# Altium PCB OFP_MCM_v1.5.PcbDoc (part 8 of 8)
Units mm, origin at the board's own origin, x right, y up, seen from the top; angles counter-clockwise.
Board outline 110 x 120 mm, 4 copper layers (Top Layer, Layer 1, Layer 2, Bottom Layer), stack 1.576 mm thick; 353 components, 268 nets, 1240 pads, 519 vias.
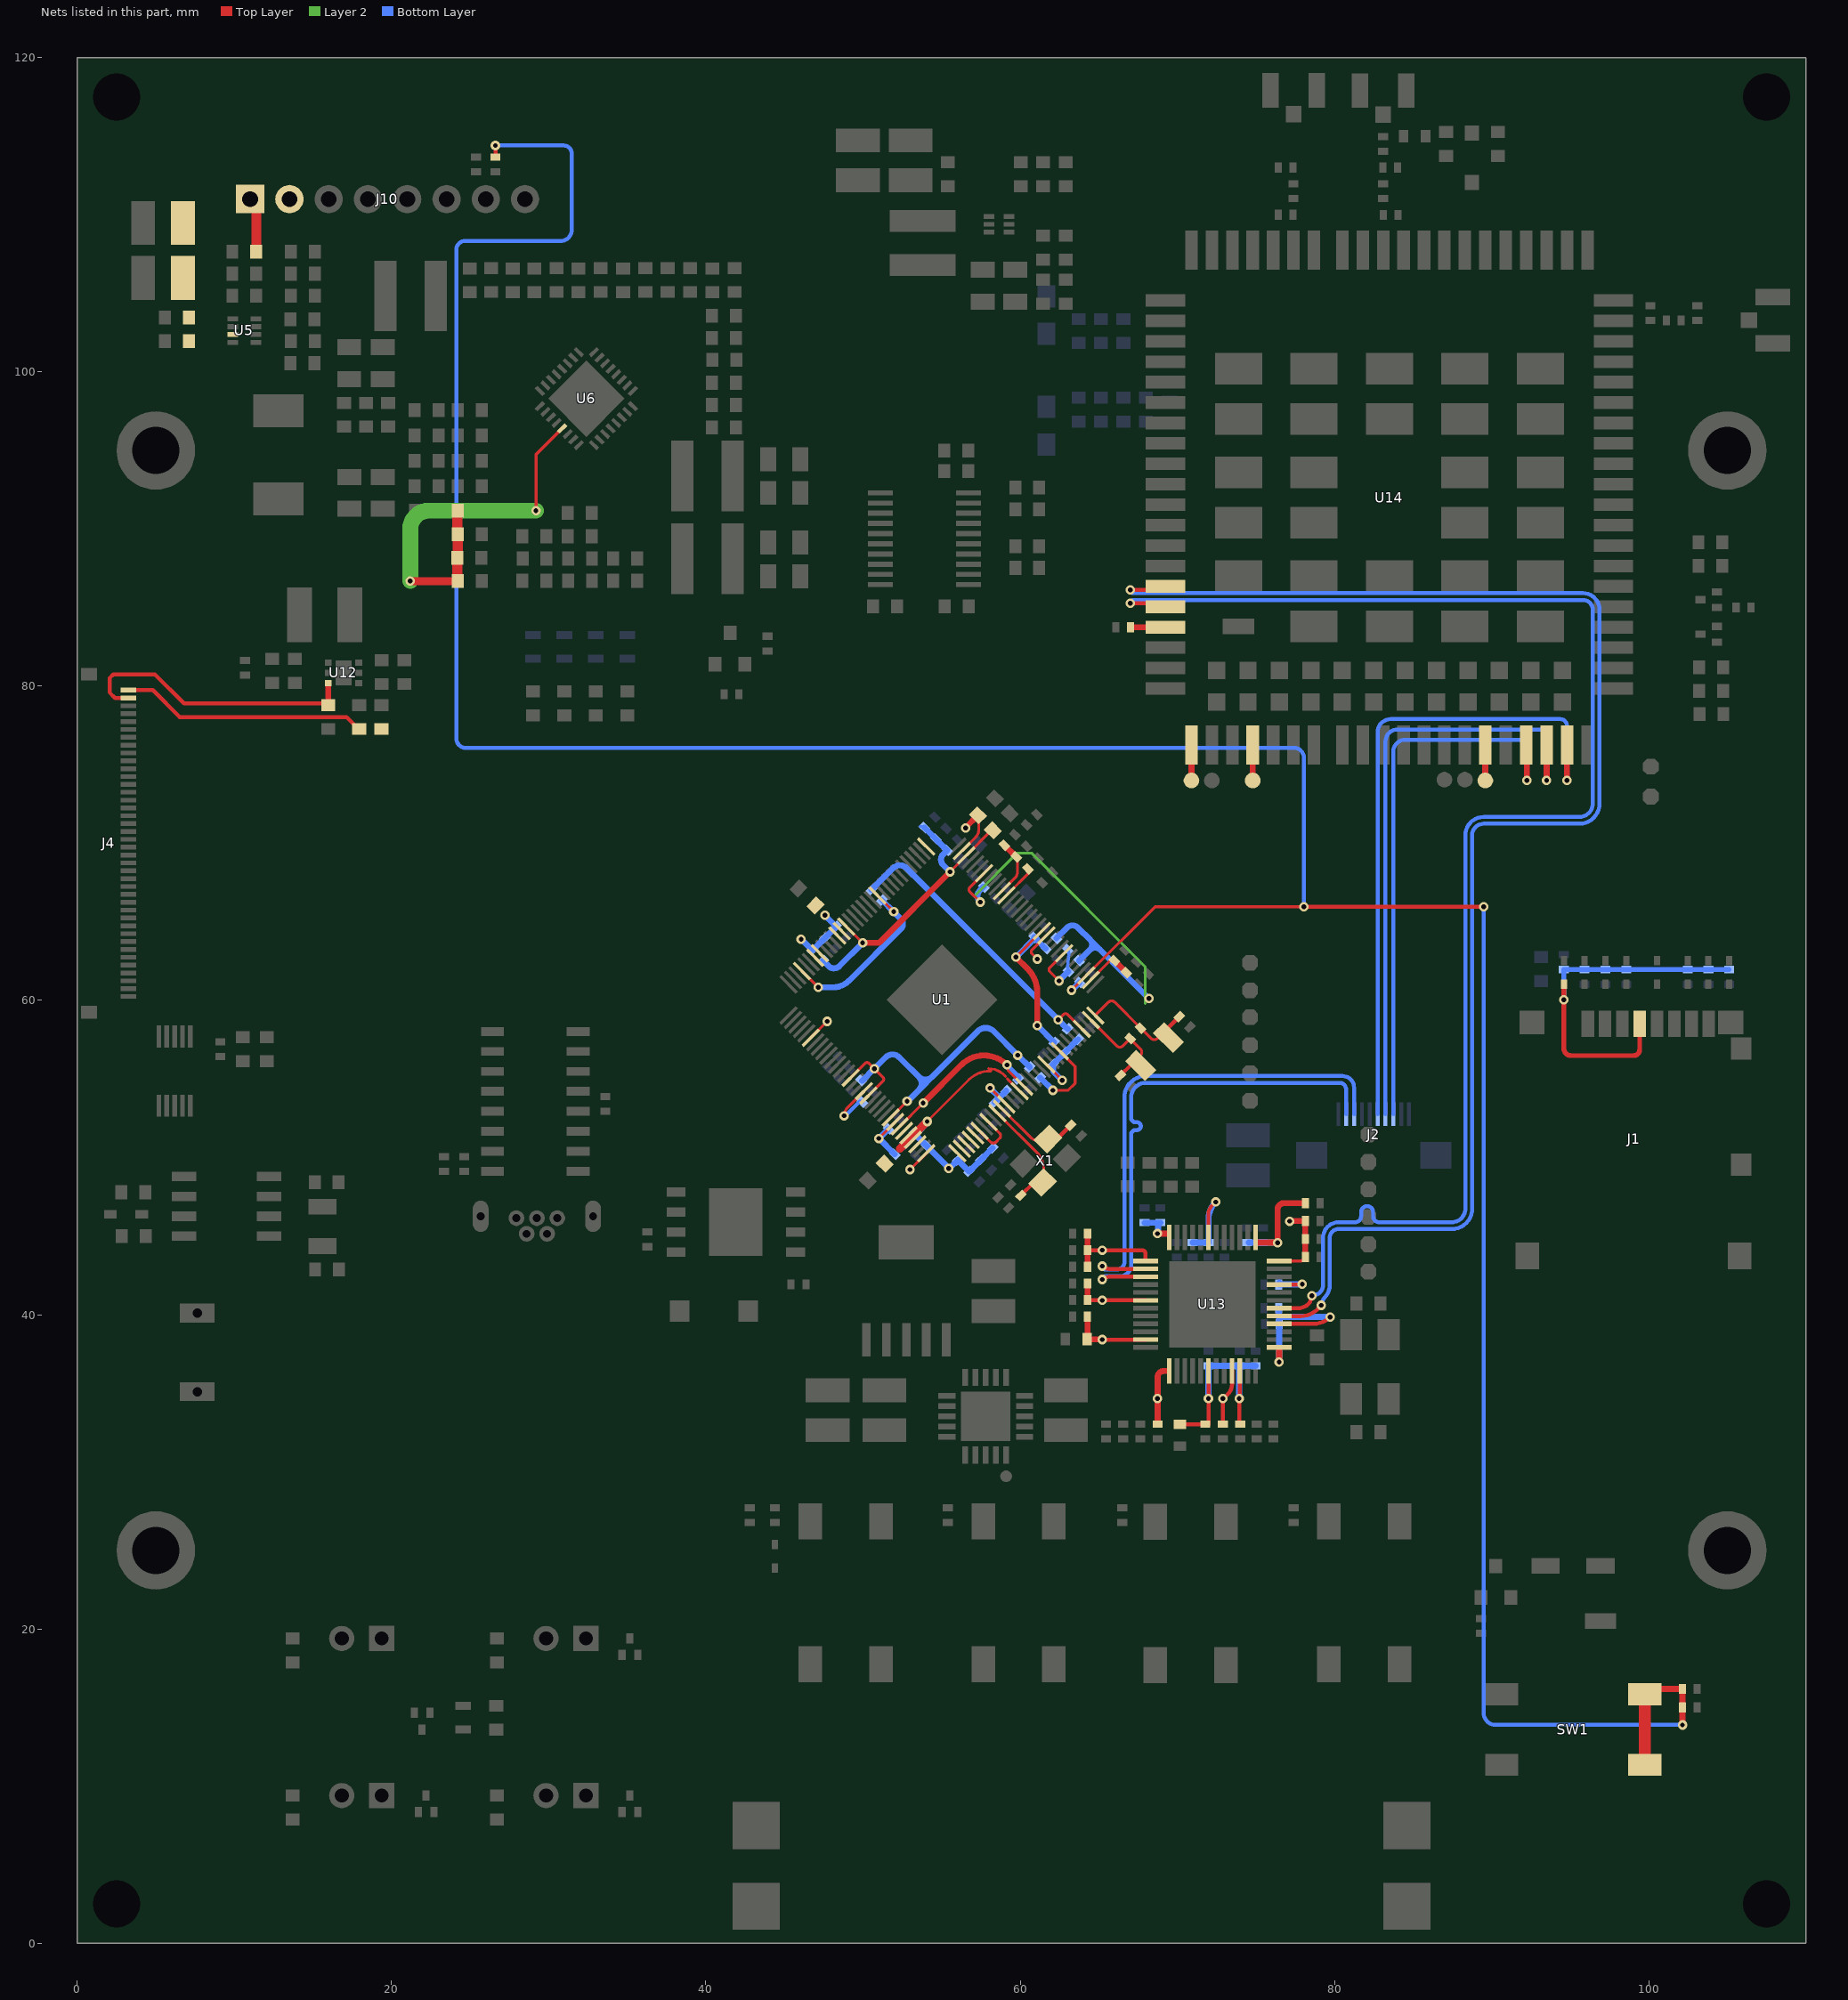
[diagram p6: the nets of this part, all layers, seen from the top]

## Via types
v1: diameter 0.6, hole 0.3, Top Layer to Bottom Layer, tented both sides, 475 vias
v2: diameter 0.5, hole 0.3, Top Layer to Bottom Layer, tented both sides, 44 vias

## Nets (pads, with @x,y where several pads share a name; then routed paths per layer and width w, separated by ;. In a path a pad name is that pad's centre, name@x,y a point inside that pad or via, vN(x,y) a via of type N, cw(c..) or ccw(c..) an arc to the next point about the centre after c; other vN are vias at no path point) (continued)
USB-GSM-D_N: U13.42 U14.70 | length 95.7
  Top Layer w0.254: v1(67.018,85.273) 69.027,85.273 cw(c69.027,85.05) U14.70@69.25,85.05 ; U13.42@76.482,40.417 77.688,40.417 ccw(c77.688,41.357) 78.353,40.692 ccw(c78.003,41.042) 78.498,41.042 cw(c78.724,41.042) v1(78.564,41.202)
  Bottom Layer w0.254: v1(67.018,85.273) cw(c67.229,85.273) 67.229,85.484 95.823,85.484 cw(c95.823,84.872) 96.434,84.872 96.434,72.467 cw(c96.18,72.468) 96.43,72.424 96.421,72.373 cw(c95.593,72.52) 95.74,71.692 95.689,71.683 cw(c95.645,71.933) 95.646,71.679 89.49,71.679 ccw(c89.49,70.519) 88.33,70.519 88.33,46.687 cw(c88.076,46.688) 88.326,46.644 88.317,46.592 cw(c87.476,46.74) 87.625,45.9 87.573,45.891 cw(c87.529,46.141) 87.53,45.887 83.868,45.887 82.84,45.887 cw(c82.84,46.268) 82.459,46.268 82.459,46.534 ccw(c82.078,46.534) 81.697,46.534 81.697,46.268 cw(c81.316,46.268) 81.316,45.887 81.189,45.887 80.271,45.887 ccw(c80.271,44.889) 79.272,44.889 79.272,42.778 ccw(c79.704,42.778) 79.273,42.747 cw(c79.02,42.729) 79.274,42.729 79.274,41.897 cw(c78.59,41.897) 79.074,41.413 cw(c78.724,41.763) 78.724,41.268 ccw(c78.724,41.042) v1(78.564,41.202)
USB-GSM-D_P: U13.41 U14.69 | length 95.8
  Top Layer w0.254: v1(67.018,86.127) 69.027,86.127 ccw(c69.027,86.35) U14.69@69.25,86.35 ; U13.41@76.482,39.917 77.888,39.917 ccw(c77.888,41.363) 78.91,40.34 v1(79.168,40.598)
  Bottom Layer w0.254: v1(67.018,86.127) ccw(c67.229,86.127) 67.229,85.916 95.823,85.916 cw(c95.823,84.872) 96.866,84.872 96.866,72.467 cw(c96.18,72.468) 96.856,72.348 96.846,72.297 cw(c95.593,72.52) 95.816,71.267 95.765,71.258 cw(c95.645,71.933) 95.647,71.247 89.49,71.247 ccw(c89.49,70.519) 88.761,70.519 88.761,46.686 cw(c88.076,46.688) 88.751,46.569 88.742,46.517 cw(c87.476,46.74) 87.7,45.475 87.648,45.466 cw(c87.529,46.141) 87.531,45.455 80.271,45.455 ccw(c80.271,44.889) 79.704,44.889 79.704,43.57 ; v1(79.168,40.598) ccw(c79.008,40.758) 79.234,40.758 cw(c79.729,40.758) 79.379,41.108 ; 79.38,41.108 ccw(c78.592,41.896) 79.706,41.896 79.706,43.57
USB-ID: U1.1
USB-PD-D_N: J2.2 U13.15 | length 32.7
  Top Layer w0.254: v1(65.22,42.24) cw(c65.648,41.812) 65.648,42.417 U13.15@67.982,42.417
  Bottom Layer w0.254: v1(65.22,42.24) cw(c65.432,42.24) 65.432,42.451 66.343,42.451 ccw(c66.343,43.173) 67.066,43.173 67.066,50.857 67.066,51.492 cw(c67.32,51.492) 67.32,51.746 67.423,51.746 ccw(c67.423,52) 67.423,52.254 67.32,52.254 cw(c67.32,52.508) 67.066,52.508 67.066,53.614 67.066,53.795 ; 67.065,53.795 cw(c67.988,53.832) 67.988,54.755 67.991,54.755 80.316,54.755 cw(c80.316,54.322) 80.749,54.322 J2.2@80.749,52.758
USB-PD-D_P: J2.3 U13.14 | length 32.6
  Top Layer w0.254: v1(65.22,43.094) ccw(c65.648,43.521) 65.648,42.917 U13.14@67.982,42.917
  Bottom Layer w0.254: v1(65.22,43.094) ccw(c65.432,43.094) 65.432,42.883 66.165,42.883 ccw(c66.165,43.352) 66.634,43.352 66.634,53.778 cw(c67.988,53.832) 67.988,55.187 67.991,55.187 80.521,55.187 cw(c80.521,54.459) 81.249,54.459 J2.3@81.249,52.758
USB_VBUS: R96.1 U14.71 | length 2.2
  Top Layer w0.381: R96.1@67.018,83.75 U14.71@69.25,83.75
USIM_CLK: J2.7 U14.16 | length 39.8
  Top Layer w0.381: v1(93.5,74) U14.16@93.5,76.25
  Bottom Layer w0.254: J2.7@83.249,52.758 83.249,76.489 cw(c84,76.489) 84,77.24 93.153,77.24 cw(c93.153,76.893) 93.5,76.893 v1(93.5,74)
USIM_DATA: J2.8 U14.15 | length 36.7
  Top Layer w0.254: U14.15@92.2,76.25 U14.15@92.25,76.2
  Top Layer w0.381: v1(92.25,74) U14.15@92.25,76.2
  Bottom Layer w0.254: J2.8@83.749,52.758 83.749,75.852 cw(c84.478,75.852) 84.478,76.581 91.937,76.581 cw(c91.937,76.268) 92.25,76.268 v1(92.25,74)
USIM_PRE: pad.2@89.6,74 U14.13 | length 2.3
  Top Layer w0.381: pad.2@89.6,74 U14.13@89.6,76.25
USIM_RST: J2.6 U14.17 | length 42.8
  Top Layer w0.381: v1(94.8,74) U14.17@94.8,76.25
  Bottom Layer w0.254: J2.6@82.749,52.758 82.749,77.078 cw(c83.573,77.078) 83.573,77.902 94.375,77.902 cw(c94.375,77.477) 94.8,77.477 v1(94.8,74)
V3S_RST: C3.2 C32.2 R1.1 R119.2 SW1.2 U1.99 | length 216.7
  Top Layer w0.178: v1(63.276,60.652) U1.99@64.212,61.589 68.587,65.964 v1(78.049,65.964)
  Top Layer w0.254: R119.2@26.61,113.67 v1(26.61,114.408) ; v1(78.049,65.964) v1(89.5,65.964)
  Top Layer w0.381: SW1.2@99.75,15.85 cw(c100.08,15.85) 100.08,16.18 R1.1@102.146,16.18 C3.2@102.146,15.015 v1(102.146,13.894)
  Top Layer w0.762: SW1.2@99.75,11.35 SW1.2@99.75,15.85
  Bottom Layer w0.178: C32.2@63.765,61.142 C32.2@63.793,61.142
  Bottom Layer w0.254: v1(26.61,114.408) 30.95,114.408 cw(c30.95,113.888) 31.47,113.888 31.47,109.057 cw(c30.742,109.057) 30.742,108.328 24.653,108.328 ccw(c24.653,107.812) 24.136,107.812 24.136,76.651 ccw(c24.714,76.651) 24.714,76.073 77.437,76.073 cw(c77.437,75.461) 78.049,75.461 v1@78.049,66.2 ; v1(89.5,65.964) 89.5,16.77 89.5,14.656 ccw(c90.273,14.656) 89.916,13.97 ccw(c90.227,14.568) 90.227,13.894 ; 90.229,13.894 v1(102.146,13.894)
  Bottom Layer w0.381: v1(63.276,60.652) C32.2@63.765,61.142
V7V: C64.2 R50.1 R51.1 R55.1 U6.5 | length 25.3
  Top Layer w0.203: v1(29.189,91.167) 29.189,94.735 U6.5@30.855,96.401
  Top Layer w0.508: v1@21.191,86.692 C64.2@24.216,86.692
  Top Layer w0.635: C64.2@24.19,86.717 R55.1@24.19,88.175 ; R50.1@24.19,89.7 R51.1@24.19,91.149 ; R55.1@24.216,88.175 R50.1@24.216,89.675
  Layer 2 w1.016: v1(21.191,86.7) 21.191,89.998 cw(c22.36,89.998) 22.36,91.167 v1(29.189,91.167)
VCC-DRAM: C16.2 C17.2 C18.2 C45.2 C46.2 R27.2 R38.2 U1.59 U1.60 U1.61 U1.62 U1.65 U1.66 U1.67 U1.68 U1.69 U1.70 U1.72 U1.79 | length 21.1
  Top Layer w0.178: v1(54.084,52.299) 56.718,54.932 cw(c58.114,53.538) 58.114,55.511 ; U1.70@57.424,51.69 57.629,51.486 57.892,51.223 58.131,50.984 ccw(c58.29,51.143) 58.45,50.984 58.697,51.231 ccw(c58.54,51.389) 58.698,51.547 58.457,51.788 U1.72@57.99,52.256 ; 57.987,55.663 cw(c57.987,54.236) 59.066,55.17 ; 59.193,55.018 59.226,54.979 U1.79@59.97,54.236
  Top Layer w0.508: 52.355,50.569 53.046,51.26 v1(54.084,52.299)
  Bottom Layer w0.178: C45.2@53.181,51.61 C45.2@53.185,51.61 ; R27.2@56.031,49.841 R27.2@56.033,49.841
  Bottom Layer w0.381: C45.2@53.236,51.559 v1@55.472,49.323 ; v1@55.498,49.308 R27.2@56.029,49.839 ; R27.2@56.033,49.841 R38.2@56.748,49.126 ; R38.2@56.762,49.127 C18.2@57.504,49.868 ; C18.2@57.503,49.869 C17.2@58.246,50.613
  Bottom Layer w0.508: C45.2@53.379,51.584 v1@54.068,52.273
  other v1: 55.447,49.308
VCC-HP: C31.2 R22.2 R23.1 U1.122 | length 31.4
  Top Layer w0.178: v1(57.463,66.262) 56.793,66.932 cw(c56.916,67.056) 56.792,67.18 U1.122@57.707,68.094
  Layer 2 w0.178: 57.082,66.643 59.819,69.38 60.724,69.38 67.953,62.151 67.953,59.805
  Bottom Layer w0.178: C31.2@57.683,67.244 C31.2@57.691,67.244
  Bottom Layer w0.381: v1@57.425,66.316 cw(c57.76,66.651) 57.425,66.986 C31.2@57.683,67.244 ; R23.1@62.307,63.958 62.973,64.623 cw(c63.332,64.265) 63.691,64.624 ; 63.692,64.623 64.466,63.848 ; R22.2@63.745,62.524 64.458,63.236 ; 64.458,63.857 cw(c64.147,63.547) 64.458,63.236 ; 64.506,63.808 v1@68.213,60.101 ; 65.078,63.236 ccw(c64.768,62.926) 64.458,63.236
  other v1: 68.207,60.121
VCC-IO: C41.2 C42.2 C43.2 C44.2 R21.2 R22.1 U1.50 U1.57 U1.104 U1.127 | length 15.7
  Top Layer w0.178: v1(48.807,52.661) cw(c49.56,52.661) 49.027,53.193 U1.50@50.071,54.236 ; v1(51.012,51.217) U1.57@52.05,52.256 ; U1.127@56.293,69.509 57.167,70.383 ccw(c56.703,70.848) 57.36,70.848 57.36,71.322 57.314,71.367 C41.2@57.314,71.78 ; v1(62.478,61.247) 61.884,61.841 cw(c62.008,61.965) 61.883,62.089 U1.104@62.798,63.003
  Top Layer w0.381: v1(56.533,70.967) 56.533,71.001 C41.2@57.314,71.78
  Bottom Layer w0.203: C43.2@63.028,63.232 C43.2@63.032,63.232 63.095,62.972 63.018,62.12 R22.1@63.081,61.859
  Bottom Layer w0.254: v1@48.842,52.625 49.777,53.559 49.92,53.559 C42.2@49.958,53.522
  Bottom Layer w0.381: C44.2@51.58,51.786 v1(51.012,51.217) R21.2@52.014,50.215 ; v1@62.556,61.334 R22.1@63.081,61.859
VCC-MCSI: C28.2 R24.2 R25.1 U1.85 | length 4.9
  Top Layer w0.178: U1.85@61.667,55.933 62.134,55.465 62.681,54.919 v1(62.681,54.909)
  Bottom Layer w0.381: C28.2@62.112,55.947 62.049,55.884 62.049,55.83 62.112,55.768 62.112,55.479 v1@62.672,54.918 ; C28.2@62.191,56.02 R24.2@62.841,56.669 ; R24.2@62.837,56.673 R25.1@63.689,57.525
VCC-PHY: R25.2 R26.1 U1.93 | length 19.4
  Top Layer w0.178: v1(62.427,58.77) 62.767,59.11 cw(c62.891,58.986) 63.015,59.11 U1.93@63.929,58.195
  Bottom Layer w0.381: R26.1@50.544,67.053 51.91,68.419 cw(c52.344,67.985) 52.778,68.419 52.779,68.418 v1(62.427,58.77) 62.917,58.279 R25.2@63.025,58.19
VCC-PLL: C30.2 R33.2 U1.76 | length 3.3
  Top Layer w0.178: v1(58.083,54.425) U1.76@59.121,53.387
  Bottom Layer w0.381: v1(58.083,54.425) 58.668,53.84 58.668,53.832 ; C30.2@58.388,53.528 R33.2@59.114,54.253
VCC-RTC: C29.2 R28.2 U1.98 | length 3
  Top Layer w0.178: U1.98@64.495,61.306 65.835,62.646 R28.2@65.843,62.646 ; R28.2@65.998,62.535 R28.2@65.998,62.537 ; C29.2@66.754,61.777 C29.2@66.754,61.78
  Top Layer w0.381: R28.2@65.998,62.535 C29.2@66.754,61.78
VCC-USB: C27.2 R23.2 R24.1 U1.109 | length 11.5
  Top Layer w0.178: v1(59.73,62.758) 59.73,62.761 61.383,64.415 U1.109@61.383,64.418
  Top Layer w0.381: v1(59.73,62.758) 60.474,62.014 ; 60.475,62.013 cw(c58.99,60.53) 61.089,60.53 v1(61.089,58.405)
  Bottom Layer w0.178: C27.2@60.891,64.018 C27.2@60.904,64.018 ; R23.2@61.63,63.293 R23.2@61.642,63.293
  Bottom Layer w0.381: v1(59.73,62.758) 60.914,63.942 60.914,63.996 C27.2@60.891,64.018 ; C27.2@60.904,64.018 R23.2@61.63,63.293 ; v1(61.089,58.405) R24.1@62.157,57.337
VCC_PE: R26.2 U1.12 U1.29 | length 12.1
  Top Layer w0.178: U1.29@46.111,61.872 v1(47.149,60.834) ; U1.12@50.919,66.68 v1(51.957,65.642)
  Bottom Layer w0.381: v1(47.149,60.834) 48.094,60.834 ccw(c48.094,62.275) 49.113,61.256 52.415,64.558 ccw(c52.101,64.871) 52.415,65.185 v1(51.957,65.642) ; R26.2@51.208,66.388 v1@51.955,65.642
VDD11: C124.2 C125.2 C126.2 C127.2 C128.2 C129.2 C130.2 C131.2 C132.2 C133.2 C134.2 C135.2 C136.2 FB2.2 U13.1 U13.12 U13.18 U13.30 U13.34 U13.45 | length 32.7
  Top Layer w0.254: C131.2@64.391,40.917 v1(65.22,40.917) U13.18@67.982,40.917 ; FB2.2@70.172,33.027 C136.2@71.583,33.027 ; C136.2@71.982,33.009 v1(71.982,34.671) U13.30@71.982,36.417 ; v1(73.937,34.671) 73.937,33.092 C133.2@73.982,33.047 ; v1@73.982,34.671 U13.34@73.982,36.417 ; U13.45@76.482,41.917 77.93,41.917 v1(77.953,41.94)
  Top Layer w0.381: C131.2@64.289,40.938 C127.2@64.289,41.994 ; v1(68.739,45.162) U13.12@69.402,45.162 ; U13.1@75.043,44.587 v1(76.381,44.587) ; v1@76.381,44.782 76.381,46.686 cw(c76.795,46.686) 76.795,47.101 C129.2@78.143,47.101
  Bottom Layer w0.178: C134.2@73.937,36.702 cw(c73.982,36.702) C134.2@73.982,36.747
  Bottom Layer w0.381: C124.2@67.912,45.858 C126.2@68.926,45.858 68.837,45.858 68.799,45.82 68.799,45.731 68.78,45.713 68.78,45.204 v1(68.739,45.162) ; v1(71.982,34.671) C130.2@71.982,36.747 C134.2@73.982,36.747 C132.2@74.982,36.747 ; v1(73.937,34.671) C134.2@73.937,36.702 ; C128.2@74.549,44.587 v1(76.381,44.587) ; C125.2@76.495,42.044 76.495,41.928 77.941,41.928 v1(77.953,41.94)
VDD33: C111.2 C112.2 C113.2 C114.2 C115.2 C116.2 C117.2 C118.2 C119.2 C120.2 C121.2 C122.2 C123.2 FB1.2 U13.7 U13.13 U13.23 U13.25 U13.33 U13.37 U13.40 U13.48 | length 41.7
  Top Layer w0.178: U13.37@76.479,37.85 76.479,37.914 U13.37@76.482,37.917 ; U13.48@76.482,43.417 77.889,43.417 77.915,43.442 78.004,43.442 78.143,43.582 C111.2@78.143,43.671 C111.2@78.144,43.899 ; v1(77.152,45.948) cw(c77.172,45.948) v1@77.172,45.967 ; C119.2@78.144,45.739 C119.2@78.144,45.967
  Top Layer w0.229: U13.7@71.982,44.917 71.982,46.396 cw(c72.762,46.396) 72.211,46.947 v1(72.439,47.176)
  Top Layer w0.254: C121.2@64.289,44.106 v1(65.22,44.106) 67.735,44.106 cw(c67.735,43.858) 67.982,43.858 U13.13@67.982,43.417 ; v1(65.22,38.417) U13.23@67.982,38.417 ; C114.2@72.904,33.047 72.898,33.053 v1(72.898,34.671) 72.948,34.671 73.215,34.938 ccw(c72.571,35.582) 73.482,35.582 U13.33@73.482,36.417 ; U13.40@76.482,39.417 78.668,39.417 ccw(c78.668,40.921) 79.73,39.856 ccw(c78.668,40.921) v1(79.732,39.857)
  Top Layer w0.381: FB1.2@64.288,38.433 65.204,38.433 v1(65.22,38.417) ; FB1.2@64.289,38.47 C123.2@64.289,39.882 ; C120.2@64.289,43.05 C121.2@64.289,44.106 C122.2@64.289,45.162 ; C117.2@68.746,33.047 v1(68.746,34.671) 68.746,36.029 cw(c69.133,36.029) 69.133,36.417 U13.25@69.398,36.417 ; v1(76.479,36.982) U13.37@76.479,37.85 ; v1@77.172,45.967 C119.2@78.144,45.967 ; C111.2@78.143,43.671 78.144,43.899 78.144,45.739 C119.2@78.144,45.967 ; C119.2@78.144,45.993 C119.2@78.144,45.967
  Bottom Layer w0.381: C112.2@70.975,44.587 C113.2@71.989,44.587 71.989,46.091 cw(c73.52,46.091) v1(72.439,47.176) ; C115.2@76.457,40.417 cw(c76.457,40.397) 76.477,40.397 76.477,39.82 ; C116.2@76.477,39.417 76.477,39.82 ; v1(76.479,36.982) C116.2@76.479,39.417 ; v1(79.732,39.857) 76.514,39.857 76.477,39.82
VDD-CPU: C37.2 C38.2 C39.2 C40.2 R35.2 R36.1 U1.20 U1.21 U1.25 U1.26 U1.38 U1.47 U1.51 U1.56 | length 29
  Top Layer w0.178: U1.38@46.677,57.63 v1(47.715,58.668) ; U1.47@49.222,55.084 50.136,55.999 ; 50.137,55.999 cw(c50.26,55.875) 50.384,55.999 v1(50.725,55.658) 51.268,55.115 cw(c51.144,54.991) 51.268,54.867 U1.51@50.353,53.953 ; U1.56@51.767,52.539 v1(52.806,53.577)
  Bottom Layer w0.178: R35.2@46.678,63.285 R35.2@46.793,63.202 ; v1(47.579,65.416) v1@47.582,65.416
  Bottom Layer w0.381: v1(46.062,63.9) R35.2@46.678,63.285 ; R35.2@46.793,63.202 C40.2@48.295,64.704 ; v1@47.582,65.416 C40.2@48.198,64.801 ; C39.2@49.945,54.884 v1@50.72,55.658 ; v1(50.725,55.658) 51.458,56.391 cw(c51.877,55.973) 52.295,56.392 52.297,56.39 53.74,54.947 53.743,54.944 ; v1@52.837,53.577 53.743,54.483 54.375,55.115 54.394,55.134 ; 53.552,54.294 ccw(c53.132,54.714) 53.552,55.135 ; 53.553,55.134 ccw(c53.974,55.554) 54.394,55.134 ; v1(59.841,56.511) 58.313,58.039 58.312,58.04 ccw(c57.806,57.534) 57.299,58.04 54.394,55.134 ; v1@59.871,56.498 R36.1@60.615,55.755
VDD-PHY: R36.2 U1.88 | length 5.9
  Top Layer w0.178: U1.88@62.048,57.249 U1.88@62.515,56.781 63.498,55.798 63.498,54.723 63.052,54.278 v1(62.088,54.278)
  Bottom Layer w0.381: R36.2@61.28,55.087 v1(62.088,54.278)
VDD-SYS: C33.2 C34.2 C35.2 C36.2 R34.2 R35.1 U1.19 U1.58 U1.64 U1.80 U1.108 U1.126 | length 35.5
  Top Layer w0.178: U1.19@48.939,64.7 v1(49.977,63.662) ; U1.58@52.333,51.973 v1(53.829,53.469) ; v1(52.992,49.237) U1.64@54.03,50.276 ; v1(55.537,68.188) U1.126@56.575,69.226 58.177,70.828 C33.2@58.266,70.828 ; v1(59.156,55.897) 59.237,55.534 U1.80@60.252,54.519 ; v1(61.093,62.632) 60.752,62.972 cw(c60.876,63.096) 60.752,63.22 U1.108@61.667,64.135
  Top Layer w0.381: v1(49.977,63.662) 51.012,63.662 v1(55.537,68.188) ; v1(53.829,53.469) 56.267,55.906 cw(c57.689,54.484) 57.689,56.496 57.712,56.496 cw(c57.712,54.453) 58.911,56.106 cw(c57.712,54.453) v1(59.156,55.897)
  Bottom Layer w0.178: R34.2@53.645,71.068 53.842,71.068 R34.2@53.905,71.005
  Bottom Layer w0.381: R35.1@47.458,62.537 47.824,62.171 ccw(c48.137,62.482) 48.137,62.041 ccw(c48.137,62.57) 48.512,62.196 v1(49.977,63.662) ; R34.2@53.905,71.005 C34.2@55.356,69.554 55.098,69.296 ccw(c55.433,68.961) 55.098,68.626 v1(55.537,68.188) ; v1(59.156,55.897) 59.156,55.838 59.901,55.094 59.901,55.065 C35.2@59.803,54.968
VIN+: C47.2 C48.2 C49.2 C149.2 J10.1 J10.2 R40.1 U5.3 | length 3.5
  Top Layer w0.635: J10.1@11,111 11.392,110.608 11.392,110.016 11.395,110.013 R40.1@11.395,107.654
VLED+: C98.2 J4.39 U12.3 | length 18.3
  Top Layer w0.254: J4.39@3.25,79.25 2.411,79.25 2.057,79.604 2.057,80.507 2.3,80.75 4.942,80.75 6.789,78.903 C98.2@15.975,78.903
  Top Layer w0.381: C98.2@15.975,78.903 U12.3@15.975,80.134
VLED-: J4.40 R84.2 R86.2 | length 15.5
  Top Layer w0.254: J4.40@3.25,79.75 4.811,79.75 6.521,78.039 17.131,78.039 R84.2@17.808,77.363
VRA1: C22.2 U1.117 | length 2.2
  Top Layer w0.178: U1.117@59.121,66.68 60.659,68.218 C22.2@60.612,68.264
VRA2: C21.2 R31.2 U1.118 | length 3.7
  Top Layer w0.178: U1.118@58.838,66.963 59.672,67.796 ccw(c59.282,68.185) 59.833,68.185 59.833,68.846 59.839,68.851 59.839,69.049 C21.2@59.776,69.112 ; R31.2@59.026,69.854 R31.2@59.033,69.854
  Top Layer w0.381: R31.2@58.931,69.956 C21.2@59.75,69.137
VSD: D1.2 J1.4 R2.2 R3.2 R4.2 R5.2 R6.2 R7.2 R8.1 | length 23.5
  Top Layer w0.305: D1.2@94.598,61.024 v1(94.598,60.049) 94.598,56.953 ccw(c95.063,56.953) 95.063,56.488 99.031,56.488 ccw(c99.031,56.88) 99.422,56.88 J1.4@99.422,58.505
  Bottom Layer w0.305: v1(94.598,60.049) R8.1@94.598,61.969 R5.2@95.917,61.969 R3.2@102.477,61.969 R7.2@105.118,61.969
W_DIS: pad.2@74.8,74 U14.4 | length 2.3
  Top Layer w0.381: pad.2@74.8,74 U14.4@74.8,76.25
WAKEUP: pad.2@70.9,74 U14.1 | length 2.3
  Top Layer w0.381: pad.2@70.9,74 U14.1@70.9,76.25
X24MIN: C1.2 U1.75 X1.1 | length 5.3
  Top Layer w0.178: U1.75@58.838,53.105 60.605,51.338 ccw(c61.481,52.214) X1.1@61.481,50.975 ; X1.1@61.777,51.179 X1.1@62.344,51.179
  Top Layer w0.254: X1.1@62.344,51.179 C1.2@63.218,52.052
X24MOUT: C2.2 U1.74 X1.3 | length 7.3
  Top Layer w0.178: U1.74@58.555,52.822 61.11,50.267 cw(c60.184,49.34) 61.494,49.35 61.494,48.592 cw(c61.253,48.592) X1.3@61.423,48.421 X1.3@60.878,48.421
  Top Layer w0.254: C2.2@60.051,47.594 X1.3@60.878,48.421
X32KIN: C5.2 R122.1 U1.96 X2.1 | length 7.1
  Top Layer w0.178: U1.96@64.778,59.044 65.627,59.893 cw(c65.82,59.7) 66.014,59.893 R122.1@67.666,58.241 67.835,58.088 68.341,57.582 ccw(c68.535,57.776) 68.729,57.582 X2.1@69.107,57.96
  Top Layer w0.254: X2.1@69.241,58.083 C5.2@70.128,58.97
X32KOUT: C6.2 R122.2 U1.95 X2.2 | length 6.6
  Top Layer w0.178: U1.95@64.495,58.761 66.155,57.101 ccw(c66.34,57.286) 66.525,57.101 R122.2@67.001,57.577 ; X2.2@67.052,55.897 X2.2@67.634,55.897 ; R122.2@67.155,57.407 67.66,56.901 cw(c67.466,56.708) 67.66,56.514 X2.2@67.283,56.136
  Top Layer w0.254: C6.2@66.376,55.221 X2.2@67.052,55.897
pads on no net: J3.4 J4.6 LS1.3 U1.81 U1.82 U1.83 U1.84 U1.86 U1.87 U1.113 U1.114 U1.119 U1.120 U1.121 U1.124 U1.125 U3.7 U4.7 U4.8 U4.9 U4.10 U4.11 U4.12 U4.13 U4.14 U4.15 U8.9 U13.16 U13.17 U13.19 U13.20 U13.28 U13.29 U13.31 U13.32 U13.43 U13.44 U13.46 U13.47 U14.3 U14.18 U14.23 U14.24 U14.25 U14.26 U14.27 U14.28 U14.29 U14.30 U14.31 U14.32 U14.33 U14.37 U14.38 U14.39 U14.40 U14.41 U14.42 U14.43 U14.44 U14.45 U14.55 U14.113 U14.114 U14.116 U14.117 U14.118 U14.119 U14.120 U14.121 U14.122 U14.123 U14.124 U14.125 U14.126 U14.127 U14.129 U14.130 U14.131 U14.132 U14.133 U14.134 U14.135 U14.136 U14.137 U14.138 U14.139 U14.140 U14.141 U14.142 U14.143 U14.144 U15.1 U15.20

## Polygon pours and split planes (outlines as drawn)
NetC53_2 on Top Layer "NONET_L-01_P-001" (solid, pour order 7): 11.033,102.041 11.033,96.323 11.228,96.128 14.063,96.128 14.4,96.466 14.4,100.641 14.044,100.997 13.221,100.997 12.177,102.041
GND on Top Layer "NONET_L-01_P-001" (solid, remove dead copper, pour order 45): 0,120 110,120 110,0 0,0 0,120
+5V on Top Layer "NONET_L-01_P-001" (solid, pour order 39): 5.842,93.193 cw(c8.382,93.193) 8.382,95.733 11.105,95.733 11.633,95.204 11.633,82.975 11.129,82.47 10.131,82.47 10.033,82.372 10.033,81.127 10.11,81.05 11.967,81.05 11.967,79.706 11.966,79.705 6.775,79.705 5.842,80.638
NetL6_2 on Top Layer "NONET_L-01_P-001" (solid, pour order 38): 16.459,86.291 16.459,81.993 17.7,81.993 17.7,81.3 18.466,81.3 18.466,86.291
+3.8V on Top Layer "NONET_L-01_P-001" (solid, pour order 37): 56.353,105.487 56.717,105.123 63.548,105.123 63.906,104.765 63.906,102.697 64.253,102.35 70.694,102.35 71.092,101.952 71.092,98.05 70.692,97.65 52.159,97.65 51.699,98.11 51.699,107.506 56.353,107.506
+5V on Top Layer "NONET_L-01_P-001" (solid, pour order 18): 56.436,112.952 56.436,116.589 56.941,117.094 62.954,117.094 63.341,116.706 63.341,112.952 62.452,112.952 62.452,114.693 62.149,114.996 58.962,114.996 58.696,114.73 58.696,109.835 58.602,109.741 57.415,109.741 57.307,109.849 57.307,111.224 57.103,111.428 51.275,111.428 48.176,111.428 47.951,111.654 47.951,112.695 48.208,112.952 54.426,112.952 54.68,112.698 56.182,112.698
VCC-DRAM on Top Layer "NONET_L-01_P-001" (solid, pour order 19): 51.612,48.848 54.736,51.971 cw(c56.532,50.175) 56.532,52.715 57.389,52.715 58.449,51.655 60.571,53.776 59.095,55.252 ccw(c57.707,53.864) 57.707,55.827 57.663,55.827 ccw(c57.663,53.287) 55.867,55.083 50.622,49.838
VIN+ on Top Layer "NONET_L-01_P-001" (solid, pour order 9): 6.353,101.777 6.622,101.508 10.233,101.508 10.233,102.512 8.613,102.512 8.103,103.022 8.103,108.687 8.508,109.093 14.402,109.093 14.744,109.436 14.744,112.814 14.402,113.157 6.299,113.157 5.972,112.83 5.972,104.581 6.353,104.2
+5V on Top Layer "NONET_L-01_P-001" (solid, pour order 4): 33.581,96.533 35.508,94.606 35.599,94.606 35.786,94.793 35.786,95.536 34.185,97.137
GND on Layer 1 "NONET_L-01_P-001" (solid, pour order 36): 0,120 110,120 110,0 0,0 0,120
+3.3V on Layer 2 "NONET_L-01_P-001" (solid, pour order 32): 25.654,6.58 ccw(c26.646,6.58) 26.646,5.588 ccw(c26.646,6.58) 27.639,6.58 27.639,25.099 28.81,26.27 88.628,26.27 91.77,29.382 91.77,67.793 92.558,68.58 108.661,68.58 109.498,67.743 109.498,0 0,0 0,92.091 58.535,92.091 59.487,91.139 59.487,82.674 58.423,81.61 38.608,81.61 37.846,80.848 37.846,50.614 40.15,48.311 47.29,48.311 47.574,48.026 47.574,45.801 47.31,45.537 37.902,45.537 34.078,49.361 34.078,77.758 33.195,78.641 28.857,78.641 27.813,77.598 27.813,63.632 18.398,54.217 18.398,33.826 25.654,26.569
+5V on Layer 2 "NONET_L-01_P-001" (solid, pour order 13): 81.976,49.718 82.405,49.718 83.439,48.683 83.439,31.242 82.55,30.353 51.943,30.353 51.211,31.085 51.211,39.128 50.588,39.751 45.466,39.751 44.958,39.243 44.958,28.037 45.81,27.184 88.017,27.184 90.691,29.858 90.691,68.292 70.5,88.482 70.5,118.222 69.088,119.634 0.381,119.634 0.381,92.784 11.437,92.784 14.363,95.711 14.363,108.099 14.005,108.458 9.779,108.458 9.144,109.093 9.144,112.004 9.789,112.649 58.801,112.649 60.198,111.252 60.198,75.026 71.374,63.85 71.374,50.458 72.114,49.718
GND on Layer 2 "NONET_L-01_P-001" (solid, pour order 52): 53.742,77.082 cw(c53.742,76.51) 54.313,76.51 54.313,71.309 49.116,66.112 48.315,66.112 47.054,67.373 46.003,67.373 42.316,63.687 42.316,59.913 48.376,53.853 47.361,52.838 50.147,50.052 51.073,50.052 51.429,49.695 51.429,47.986 52.145,47.271 59.517,47.271 61.257,49.011 63.486,49.011 63.906,48.59 63.899,48.583 63.899,34.994 63.365,34.459 60.138,34.459 59.733,34.055 59.733,31.613 59.108,30.988 52.422,30.988 51.852,31.558 51.852,39.715 51.105,40.462 45.14,40.462 44.044,39.366 44.044,30.81 43.155,29.921 28.639,29.921 22.633,35.928 22.633,52.361 29.809,59.538 31.775,59.538 31.775,48.771 36.985,43.561 58.518,43.561 ccw(c58.518,44.373) 59.329,44.373 59.329,44.619 ccw(c58.411,44.619) 58.411,45.537 48.402,45.537 48.1,45.839 48.1,48.143 47.343,48.9 40.884,48.9 38.718,51.067 38.718,76.557 39.243,77.082
VCC-IO on Layer 2 "NONET_L-01_P-001" (solid, pour order 43): 58.248,63.493 60.34,65.584 60.771,65.584 63.883,62.471 63.883,62.078 55.86,54.055 55.86,51.487 54.869,50.496 50.362,50.496 48.159,52.698 48.159,52.89 48.784,53.515 48.969,53.515 50.757,51.727 54.313,51.727 54.643,52.057 54.643,54.928 62.141,62.425 62.141,62.782 61.349,63.574 60.757,63.574 57.59,60.406 57.012,60.406 50.984,66.434 50.984,67.227 55.852,72.095 55.984,72.095 57.406,70.673 57.406,70.322 54.313,67.229 54.313,66.883 57.704,63.493
GND on Layer 2 "NONET_L-01_P-001" (solid, pour order 50): 110,120 73.289,120 71.679,118.389 71.679,88.82 90.874,69.624 108.642,69.624 110,70.982
GND on Layer 2 "NONET_L-01_P-001" (solid, pour order 51): 59.487,93.683 58.588,92.784 38.22,92.784 37.552,93.452 37.552,109.336 36.788,110.1 27.604,110.1 27.604,111.989 58.344,111.989 59.487,110.845
+1.2V on Layer 2 "NONET_L-01_P-001" (solid, pour order 49): 16.9,108.718 17.402,109.22 36.214,109.22 36.816,108.618 36.816,102.682 36.215,102.081 17.407,102.081 16.9,102.588
VDD-SYS on Layer 2 "NONET_L-01_P-001" (solid, pour order 48): 52.263,50.038 51.953,49.728 51.953,48.08 52.282,47.752 59.208,47.752 59.841,48.385 59.841,52.873 62.112,55.143 62.112,55.595 60.216,57.491 59.842,57.491 56.284,53.934 56.284,51.311 55.011,50.038
AVCC on Layer 2 "NONET_L-01_P-001" (solid, pour order 47): 62.895,54.894 62.895,55.414 60.672,57.637 60.672,58.049 64.275,61.652 64.275,62.636 63.26,63.651 60.922,65.989 60.196,65.989 58.088,63.881 57.865,63.881 57.485,64.261 57.485,64.469 60.762,67.747 61.412,67.747 66.953,62.206 66.953,59.778 66.953,53.291 63.17,49.508 62.435,49.508 60.235,51.709 60.235,52.234
VDD-SYS on Layer 2 "NONET_L-01_P-001" (solid, pour order 44): 46.129,62.371 49.934,66.177 50.629,66.177 56.713,60.092 57.856,60.092 60.918,63.154 61.217,63.154 61.655,62.716 61.655,62.506 54.243,55.093 54.243,53.002 54.101,52.861 53.515,52.861 53.377,52.999 53.377,54.428 46.129,61.676
VCC-HP on Layer 2 "NONET_L-01_P-001" (solid, pour order 46): 67.35,60.129 67.35,53.747 67.838,53.258 69.923,53.258 70.425,53.76 70.425,63.403 62.343,71.485 61.485,71.485 56.116,66.116 56.116,65.625 56.85,64.891 57.331,64.891 60.602,68.161 61.553,68.161 67.35,62.365
VDD-CPU on Layer 2 "NONET_L-01_P-001" (solid, pour order 42): 46.811,66.964 48.26,65.515 48.26,65.118 45.7,62.558 45.7,61.475 51.816,55.359 51.816,54.846 50.215,53.245 49.817,53.245 42.863,60.199 42.863,63.518 46.308,66.964
+5V on Layer 2 "NONET_L-01_P-001" (solid, pour order 27): 10.668,108.107 11.019,108.458 14.005,108.458 14.4,108.063 14.4,101.721 14.775,101.346 36.216,101.346 36.816,100.747 36.816,93.406 36.194,92.784 11.437,92.784 10.668,93.553
VDD33 on Layer 2 "NONET_L-01_P-001" (solid, pour order 33): 64.389,48.611 64.75,48.971 82.063,48.971 82.639,48.395 82.639,31.839 81.788,30.988 68.04,30.988 67.386,31.642 67.386,35.765 66.956,36.195 64.833,36.195 64.389,36.639 64.389,38.5 64.805,38.917 72.562,38.917 73.22,38.259 73.22,33.49 73.599,33.111 75.418,33.111 75.828,33.521 75.828,37.082 76.203,37.456 78.953,37.456 79.429,37.932 79.429,42.982 79.033,43.378 77.569,43.378 77.137,43.81 77.137,45.329 76.543,45.923 67.502,45.923 67.061,45.481 67.061,44.168 66.625,43.733 64.662,43.733 64.389,44.006
VDD11 on Layer 2 "NONET_L-01_P-001" (solid, pour order 41): 64.389,43.02 64.684,43.332 66.782,43.332 67.455,44.005 67.455,45.319 67.66,45.525 76.37,45.525 76.74,45.155 76.74,43.458 77.216,42.982 78.782,42.982 79.036,42.729 79.036,38.088 78.796,37.849 76.045,37.849 75.439,37.243 75.439,33.694 75.247,33.502 73.788,33.502 73.609,33.681 73.609,38.424 72.621,39.412 64.749,39.412 64.389,39.772
+3.3V on Bottom Layer "NONET_L-01_P-001" (solid, pour order 53): 47.698,56.105 46.523,54.929 ccw(c48.098,53.354) 45.87,53.354 45.87,41.81 ccw(c46.66,41.81) 46.66,41.021 50.564,41.021 ccw(c50.564,42.198) 51.741,42.198 51.741,49.493 ccw(c51.182,49.493) 51.182,50.052 50.574,50.052 ccw(c50.574,49.414) 49.936,49.414 49.936,47.557 cw(c49.371,47.557) 49.371,46.991 47.704,46.991 cw(c47.704,47.628) 47.066,47.628 47.066,52.777 cw(c47.911,52.777) 47.314,53.374 48.871,54.932
GND on Bottom Layer "NONET_L-01_P-001" (solid, remove dead copper, pour order 5): 0,120 110,120 110,0 0,0 0,120
+5V on Bottom Layer "NONET_L-01_P-001" (solid, pour order 40): 70.189,50.504 69.875,50.818 69.875,53.916 70.112,54.153 80.099,54.153 80.374,53.878 80.374,51.756 80.083,51.464 76.804,51.464 75.844,50.504
3.3V-HUB on Bottom Layer "NONET_L-01_P-001" (solid, pour order 23): 70.404,43.876 70.404,42.677 ccw(c70.553,42.677) 70.553,42.528 72.382,42.528 ccw(c72.382,42.706) 72.56,42.706 72.56,43.876 73.32,43.876 73.32,40.256 cw(c72.98,40.256) 72.98,39.917 65.037,39.917 ccw(c65.037,39.486) 64.606,39.486 64.606,37.403 cw(c64.338,37.403) 64.338,37.135 61.179,37.135 cw(c61.179,37.329) 60.985,37.329 60.985,41.3 cw(c61.62,41.3) 61.62,41.935 69.34,41.935 ccw(c69.34,42.24) 69.645,42.24 69.645,43.876

## Other copper
Top Layer:
  rectangle net GND: 9.563,100.819 10.645,102.041
  rectangle net GND: 16.95,80.65 20.118,81.05
  rectangle net GND: 9.563,101.721 10.645,102.041
  rectangle net 1.1V-HUB: 61.519,31.892 64.313,33.924
  rectangle net GND: 40.215,41.415 43.615,48.05
  rectangle net +3.3V: 41.132,82.941 44.249,83.861
  rectangle net +3.0V: 41.873,78.138 42.902,81.861
  rectangle net GND: 10.365,81.23 12.856,82.119
  rectangle net NetR82_1: 13.399,81.229 16.2,82.119
  rectangle net +5V: 11.967,80.65 16.2,81.05
  rectangle net +5V: 14.671,80.583 16.2,81.05
  rectangle net VLED-: 17.496,76.896 19.801,77.658
  rectangle net +3.8V: 68,97.65 70.5,102.35
  rectangle net +5V: 9.5,79.705 15.53,81.048
  region net USB-D_N: 61.172,64.63 62.197,65.655 62.056,65.797 61.03,64.771
  region net USB-D_P: 60.889,64.913 61.914,65.938 61.773,66.079 60.747,65.054
  rectangle net 1.1V-HUB: 58.926,35.464 60.82,36.551
  rectangle net 1.1V-HUB: 61.519,31.892 65.777,32.336
  rectangle net 1.1V-HUB: 59.733,33.33 64.313,33.924
  rectangle net 1.1V-HUB: 59.733,33.357 60.82,36.551
  rectangle net NetR63_1: 58.952,109.741 61.9,112.19
  rectangle net +3.8V: 51.699,103.963 63.341,105.123
  rectangle net +3.8V: 51.699,103.963 56.353,107.506
  rectangle net NetR58_1: 58.952,108.282 61.9,109.041
  region net VCC-DRAM: 59.098,55.273 58.93,55.105 60.414,53.62 60.583,53.788
  region net VCC-DRAM: 57.098,53.313 56.93,53.144 58.434,51.64 58.603,51.808
  region net AGND: 59.806,66.634 59.638,66.802 58.788,65.952 58.956,65.784
  region net AGND: 62.193,67.692 63.196,68.695 60.281,71.61 59.279,70.607
  region net VDD-CPU: 45.85,63.688 47.419,62.12 47.844,62.544 46.275,64.113
  region net VDD-CPU: 47.608,64.759 48.249,65.4 47.254,66.395 46.613,65.754
  region net VDD-CPU: 46.38,65.987 48.833,63.534 49.258,63.958 46.804,66.412
  region net VCC-DRAM: 51.612,48.848 54.066,51.301 53.076,52.291 50.622,49.838
  region net VCC-DRAM: 58.025,51.231 56.964,52.291 55.328,50.655 56.388,49.594
  region net VCC-DRAM: 57.848,51.383 57.526,51.705 55.422,49.601 55.744,49.279
  rectangle net GND: 71.461,31.879 72.143,32.336
  rectangle net VDD11: 71.461,32.819 72.143,33.276
  rectangle net NetR110_2: 102.833,77.787 103.607,80.145
  rectangle net EC_RST: 102.833,80.756 103.624,84.085
  rectangle net EC_PWR: 102.781,84.722 103.624,89.601
  rectangle net VDD33: 75.682,43.267 78.372,43.567
  rectangle net NetD9_2: 3.705,44.556 4.743,46.653
  rectangle net +3.3V: 1.705,46.133 3.194,48.238
  rectangle net +5V: 57.415,109.741 58.602,110.293
  rectangle net NetC53_2: 11.033,101.22 12.207,102.041
  rectangle net VIN+: 7.496,102.221 10.233,102.541
  rectangle net NetC53_2: 11.033,101.881 12.159,102.041
  region net +5V: 34.185,97.137 33.581,96.533 35.153,94.961 35.757,95.565
  region net GND: 33.751,95.712 33.927,95.889 32.554,97.262 32.378,97.085
  region net GND: 34.811,96.773 34.988,96.949 33.615,98.322 33.438,98.146
  region net GND: 34.281,100.358 34.104,100.535 32.731,99.162 32.908,98.985
  region net GND: 31.049,100.888 30.873,100.711 32.245,99.338 32.422,99.515
  region net NetC65_2: 33.125,96.076 32.86,95.812 34.523,94.149 34.788,94.413
  region net NetC72_2: 34.892,97.844 34.628,97.58 36.289,95.918 36.554,96.182
  region net NetC54_2: 31.721,100.57 31.898,100.747 30.525,102.12 30.348,101.943
  region net +EXT: 104.191,81.645 ccw(c104.191,81.477) 104.024,81.477 104.024,79.496 ccw(c104.264,79.496) 104.264,79.255 105.437,79.255 cw(c105.437,78.712) 105.98,78.712 105.98,78.676 106.487,78.676 106.487,81.071 ccw(c105.913,81.071) 105.913,81.645
  region net +1.2V: 20.454,107.195 20.454,101.304 20.215,101.065 16.554,101.065 16.554,107 16.954,107.4 20.249,107.4
  region net +5V: 16.111,92.3 15.784,91.973 15.784,82.47 11.129,82.47 10.785,82.814 10.785,91.148 10.785,95.412 11.105,95.733 14.642,95.733 15.8,96.89 20.27,96.89 20.6,97.221 20.6,100.552 21.037,100.989 22.31,100.989 22.316,100.988 30.242,100.988 31.191,100.04 30.663,99.512 29.989,100.187 29.763,100.413 26.485,100.413 26.379,100.306 24.487,98.414 22.225,98.414 21.87,98.059 21.87,90.73 21.108,90.73 21.108,92.027 20.834,92.3
  pour cut-out: 42.543,106.232 27.044,106.232 27.044,105.433 42.543,105.433
  pour cut-out: 51.559,107.506 51.559,111.04 51.311,111.04 51.311,107.506
  pour cut-out: 99.262,81.804 99.262,83.096 98.986,83.096 98.986,81.804
  pour cut-out: 66.234,32.473 76.685,32.473 76.685,32.817 66.234,32.817
  pour cut-out: 82.915,51.841 82.792,51.841 82.792,44.101 82.915,44.101
  pour cut-out: 82.411,37.098 82.548,37.098 82.548,41.969 82.411,41.969
  pour cut-out: 16.684,45.119 16.754,45.119 16.754,46.298 16.684,46.298
  pour cut-out: 12.856,81.226 13.047,81.226 13.047,82.211 12.856,82.211
  pour cut-out: 24.658,94.911 24.851,94.911 24.851,95.369 24.658,95.369
  pour cut-out: 21.986,92.184 21.986,92.019 22.444,92.019 22.444,92.184
  pour cut-out: 14.744,101.534 14.744,105.206 13.946,105.206 13.946,101.534
  pour cut-out: 15.76,108.283 15.76,109.846 15.555,109.846 15.555,108.283
  pour cut-out: 22.2,107.583 22.2,107.659 19.618,107.659 19.618,107.583
  pour cut-out: 11.021,103.795 11.021,108.107 10.241,108.107 10.241,103.795
  pour cut-out: 3.919,62.1 3.919,62.4 3.75,62.4 3.75,62.1
  pour cut-out: 3.919,65.6 3.919,65.9 3.75,65.9 3.75,65.6
  pour cut-out: 3.919,73.1 3.919,73.9 3.75,73.9 3.75,73.1
  pour cut-out: 3.919,69.1 3.919,69.9 3.75,69.9 3.75,69.1
  pour cut-out: 70.347,48.774 70.347,51.564 70.248,51.564 70.248,48.774
  pour cut-out: 94.144,59.345 94.144,61.578 96.566,61.578 96.566,65.131 104.452,65.131 104.452,59.345
  region net 3.3V-HUB: 157 vertices and 0 holes, not listed, extent 49.705,30.527 63.168,40.996
  region net +5V: 52.008,39.439 52.081,39.365 52.121,39.27 52.121,39.218 52.121,37.368 52.121,37.296 52.066,37.164 51.965,37.063 51.832,37.008 49.672,37.008 49.619,37.003 49.522,36.962 49.448,36.888 49.408,36.791 49.403,36.739 49.403,34.686 49.403,34.635 49.364,34.542 49.293,34.47 49.2,34.432 46.359,34.432 46.206,34.495 46.088,34.613 46.025,34.766 46.025,34.849 46.025,39.041 46.025,39.128 46.091,39.289 46.214,39.412 46.375,39.479 51.912,39.479
  region net NetC54_2: 24.276,107.067 24.276,105.728 24.559,105.444 25.421,105.444 25.428,105.437 25.428,102.956 25.753,102.632 30.013,102.632 31.223,101.421 31.221,101.418 31.895,100.744 31.727,100.576 31.233,101.071 31.211,101.085 31.049,101.247 31.047,101.244 31.041,101.25 30.707,100.917 30.377,101.247 22.058,101.247 21.854,101.451 21.854,107.206 22.049,107.4 23.943,107.4
  region net +3.3V: 44.475,90.447 44.475,83.16 44.13,82.814 41,82.814 41,90.855 44.068,90.855
  region net +1.8V: 44.475,95.193 44.475,91.542 44.068,91.134 41,91.134 41,95.634 44.034,95.634
  region net NetC65_2: 33.567,95.529 33.589,95.515 33.751,95.353 33.799,95.401 33.803,95.398 34.073,95.668 35.774,93.968 35.774,91.601 36.519,90.855 39.2,90.855 39.2,85.51 39.034,85.344 33.797,85.344 33.595,85.546 33.595,87.022 33.722,87.149 34.713,87.149 34.865,86.998 34.865,86.006 34.981,85.89 36.153,85.89 36.262,85.999 36.262,86.006 36.262,87.403 36.262,87.425 36.262,88.822 36.262,88.842 36.008,89.096 34.865,89.096 34.463,89.499 34.463,94.293 33.577,95.179 33.579,95.182 32.905,95.856 33.072,96.024
  region net NetC72_2: 35.518,97.121 35.521,97.123 35.73,96.914 38.882,96.914 38.885,96.917 40.892,96.917 40.892,96.028 39.37,96.028 39.184,95.858 39.184,91.134 36.643,91.134 36.043,91.734 36.043,96.248 35.344,96.947 35.347,96.949 35.185,97.111 35.171,97.133 34.676,97.628 34.844,97.795
Bottom Layer:
  rectangle net GND: 84.124,51.308 84.874,53.508
  rectangle net GND: 63.274,96.457 67.017,97.219
  rectangle net GND: 63.274,102.981 67.017,103.743
  rectangle net +3.8V: 61.099,97.498 68.444,102.6
  rectangle net VDD33: 76.228,39.099 76.705,40.734
  rectangle net +USIM: 81.574,52.008 82.429,54.527
  rectangle net +3.3V: 92.712,62.387 94.915,63.15
  region net +1.8V: 42.4,92.277 42.4,94.667 cw(c42.729,94.667) 42.729,94.996 44.734,94.996 cw(c44.734,94.629) 45.101,94.629 45.101,91.208 44.213,91.208 ccw(c43.508,91.243) 43.543,91.948 42.729,91.948 cw(c42.729,92.277)
  pour cut-out: 55.029,72.825 54.879,72.825 54.879,73.338 55.029,73.338
  pour cut-out: 23.443,12.618 23.443,12.804 24.741,12.804 24.741,12.618
  pour cut-out: 45.285,95.939 45.36,95.939 45.36,94.239 45.285,94.239
  pour cut-out: 95.221,73.53 95.221,73.446 91.095,73.446 91.095,73.53
  pour cut-out: 76.07,40.086 75.969,40.086 75.969,42.03 76.07,42.03
  pour cut-out: 66.044,55.426 66.044,55.576 67.988,55.576 67.988,55.426
Multi-Layer:
  pour cut-out: 107.5,0 cw(c107.5,2.5) 105,2.5 cw(c107.5,2.5) 107.5,5 cw(c107.5,2.5) 110,2.5 cw(c107.5,2.5)
  pour cut-out: 2.5,0 cw(c2.5,2.5) 0,2.5 cw(c2.5,2.5) 2.5,5 cw(c2.5,2.5) 5,2.5 cw(c2.5,2.5)
  pour cut-out: 2.5,115 cw(c2.5,117.5) 0,117.5 cw(c2.5,117.5) 2.5,120 cw(c2.5,117.5) 5,117.5 cw(c2.5,117.5)
  pour cut-out: 107.5,115 cw(c107.5,117.5) 105,117.5 cw(c107.5,117.5) 107.5,120 cw(c107.5,117.5) 110,117.5 cw(c107.5,117.5)
  pour cut-out: 5,91.5 cw(c5,95) 1.5,95 cw(c5,95) 5,98.5 cw(c5,95) 8.5,95 cw(c5,95)
  pour cut-out: 5,21.5 cw(c5,25) 1.5,25 cw(c5,25) 5,28.5 cw(c5,25) 8.5,25 cw(c5,25)
  pour cut-out: 105,21.5 cw(c105,25) 101.5,25 cw(c105,25) 105,28.5 cw(c105,25) 108.5,25 cw(c105,25)
  pour cut-out: 105,91.5 cw(c105,95) 101.5,95 cw(c105,95) 105,98.5 cw(c105,95) 108.5,95 cw(c105,95)

## Silkscreen, mask and mechanical layers (free items; w line width, h text height)
Top Overlay:
  drawing of 67 lines, arcs and shapes, not listed
  text "6" at 16.499,118.804 h1.27
  text "GNSS" at 86.215,117.064 h2.54
  text "MAIN" at 68.723,117.035 h2.54
  text "6" at 16.622,107.961 h1.27
  text "DIV" at 108.771,106.459 h2.54 r90
  text "5" at 26.105,99.051 h1.27
  text "4" at 34.419,90.858 h1.27
  text "4" at 50.076,80.473 h1.27
  text "VDD-SDIO" at 101.13,74.416 h1.27
  text "VDD-USIM" at 101.257,72.649 h1.27
  text "RGB LCD" at 6.507,62.85 h2.54 r90
  text "EPHY-TXP" at 75.655,61.912 h1.27
  text "EPHY-TXN" at 75.618,60.157 h1.27
  text "EPHY-RXP" at 75.63,58.443 h1.27
  text "5" at 23.408,57.686 h1.27
  text "EPHY-RXN" at 75.593,56.665 h1.27
  text "EPHY-SPD" at 75.655,54.887 h1.27
  text "EPHY-LNK" at 75.586,53.109 h1.27
  text "PWR-CTL2" at 83.12,50.775 h1.27
  text "PWR-CTL1" at 83.12,49.028 h1.27
  text "PWR-CTL0" at 83.12,47.281 h1.27
  text "SMB-DAT" at 83.12,45.535 h1.27
  text "3" at 61.048,43.774 h1.27
  text "SMB-CLK" at 83.12,43.788 h1.27
  text "SMB-USZ" at 83.12,42.086 h1.27
  text "SD CARD" at 91.872,40.64 h2.54
  text "3" at 86.937,35.943 h1.27
  text "PWR" at 15.1,22.957 h2.54
  text "GSM" at 28.1,22.957 h2.54
  text "HOME" at 54.259,19.156 h2.54 r90
  text "NEXT" at 65.259,19.156 h2.54 r90
  text "BACK" at 76.217,19.116 h2.54 r90
  text "ENTER" at 87.259,18.713 h2.54 r90
  text "MES" at 15.1,12.957 h2.54
  text "NET" at 28.1,12.957 h2.54
  text "RESET" at 91.611,8.241 h2.54
  text "OFP_MSM_V1.5" at 13.917,1.497 h1.78
Bottom Overlay:
  drawing of 31 lines, arcs and shapes, not listed
  text "STATUS" at 68.913,99.429 h1.52 r270
  text "3V8" at 28.437,84.424 h1.52 r270
  text "3V0" at 30.437,84.424 h1.52 r270
  text "1V8" at 32.437,84.424 h1.52 r270
  text "1V2" at 34.437,84.424 h1.52 r270
  text "2" at 58.126,46.752 h1.52 r315
  text "1" at 74.289,46.56 h1.52
  text "USM EXT" at 87.392,44.529 h2.54
  text "2" at 57.907,42.5 h1.52 r315
  text "DEBUG" at 32.864,41.451 h2.54
  text "1" at 84.222,40.133 h1.52
  text "OFP_MSM_V1.5" at 34.893,1.354 h1.78
Dimension:
  circle w0.013: c107.5,2.5 r1.7
Board Outline:
  lines w0.254: 0,0 0,120 110,120 110,0 0,0 ; 41.121,4.1 ccw(c41.38,4.1) 41.38,3.841 86.42,3.841 ccw(c86.42,4.1) 86.679,4.1 86.679,5.73 ccw(c86.42,5.73) 86.42,5.989 81.988,5.989 cw(c81.988,6.218) 81.759,6.218 81.759,7.95 ccw(c81.5,7.95) 81.5,8.209 62.154,8.209 cw(c62.154,8.454) 61.909,8.454 61.909,13.45 ccw(c61.65,13.45) 61.65,13.709 47.05,13.709 ccw(c47.05,13.45) 46.791,13.45 46.791,6.221 cw(c46.559,6.221) 46.559,5.989 41.38,5.989 ccw(c41.38,5.73) 41.121,5.73 41.121,4.1 ; 80.7,88.5 86.3,88.5 86.3,95.5 80.7,95.5 80.7,88.5
Fabrication:
  drawing of 295 lines, arcs and shapes, not listed
  text "Layer" at 195.849,172.974 h1.52
  text "Name" at 206.26,172.974 h1.52
  text "Material" at 229.876,172.974 h1.52
  text "Thickness" at 251.714,172.974 h1.52
  text "Constant" at 268.22,172.974 h1.52
  text "Board Layer Stack" at 282.694,172.974 h1.52
  text "Top Overlay" at 206.26,169.926 h1.52
  text "Top Solder" at 206.26,166.878 h1.52
  text "Solder Resist" at 229.876,166.878 h1.52
  text "0.010mm" at 251.714,166.878 h1.52
  text "3.5" at 268.22,166.878 h1.52
  text "1" at 195.849,163.83 h1.52
  text "Top Layer" at 206.26,163.83 h1.52
  text "0.035mm" at 251.714,163.83 h1.52
  text "Dielectric 2" at 206.26,160.782 h1.52
  text "PP-006" at 229.876,160.782 h1.52
  text "0.203mm" at 251.714,160.782 h1.52
  text "4.4" at 268.22,160.782 h1.52
  text "2" at 195.849,157.734 h1.52
  text "Layer 1" at 206.26,157.734 h1.52
  text "CF-004" at 229.876,157.734 h1.52
  text "0.035mm" at 251.714,157.734 h1.52
  text "Dielectric 1" at 206.26,154.686 h1.52
  text "FR-4" at 229.876,154.686 h1.52
  text "1.030mm" at 251.714,154.686 h1.52
  text "4.6" at 268.22,154.686 h1.52
  text "3" at 195.849,151.638 h1.52
  text "Layer 2" at 206.26,151.638 h1.52
  text "CF-004" at 229.876,151.638 h1.52
  text "0.035mm" at 251.714,151.638 h1.52
  text "Dielectric 3" at 206.26,148.59 h1.52
  text "PP-006" at 229.876,148.59 h1.52
  text "0.203mm" at 251.714,148.59 h1.52
  text "4.4" at 268.22,148.59 h1.52
  text "4" at 195.849,145.542 h1.52
  text "Bottom Layer" at 206.26,145.542 h1.52
  text "0.035mm" at 251.714,145.542 h1.52
  text "Bottom Solder" at 206.26,142.494 h1.52
  text "Solder Resist" at 229.876,142.494 h1.52
  text "0.010mm" at 251.714,142.494 h1.52
  text "3.5" at 268.22,142.494 h1.52
  text "Bottom Overlay" at 206.26,139.446 h1.52
  text "Total board thickness:" at 195.849,136.398 h1.52
  text "1.596mm" at 251.714,136.398 h1.52
Drill Drawing:
  lines w0.254: 1.909,150.283 3.602,150.283 2.756,148.59 1.909,150.283 ; 1.909,152.4 2.756,152.823 3.602,152.4 3.179,153.247 3.602,154.093 2.756,153.67 1.909,154.093 2.332,153.247 1.909,152.4 ; 1.909,156.633 2.332,156.633 2.756,156.21 3.179,156.633 3.602,156.633 3.179,157.057 3.602,157.48 3.179,157.48 2.756,157.903 2.332,157.48 1.909,157.48 2.332,157.057 1.909,156.633 ; 1.909,160.02 3.602,160.02 3.602,161.713 1.909,161.713 1.909,160.02 ; 1.909,163.83 1.909,164.253 2.332,164.677 1.909,165.1 1.909,165.523 2.332,165.523 2.756,165.1 3.179,165.523 3.602,165.523 3.602,165.1 3.179,164.677 3.602,164.253 3.602,163.83 3.179,163.83 2.756,164.253 2.332,163.83 1.909,163.83 ; 1.909,168.063 2.332,168.063 2.332,167.64 3.179,167.64 3.179,168.063 3.602,168.063 3.602,168.91 3.179,168.91 3.179,169.333 2.332,169.333 2.332,168.91 1.909,168.91 1.909,168.063 ; 1.909,172.297 2.756,171.45 3.602,172.297 2.756,173.143 1.909,172.297
  lines w0.381: 0.39,147.447 187.334,147.447 ; 0.39,174.117 187.334,174.117 ; 14.382,143.637 14.382,177.927 ; 29.618,143.637 29.618,177.927 ; 58.058,143.637 58.058,177.927 ; 70.907,143.637 70.907,177.927 ; 89.546,143.637 89.546,177.927 ; 127.635,143.637 127.635,177.927 ; 142.617,143.637 142.617,177.927 ; 161.56,143.637 161.56,177.927 ; 0.39,143.637 187.334,143.637 187.334,177.927 0.39,177.927 0.39,143.637
  text "Symbol" at 2.676,175.26 h1.83
  text "Count" at 15.525,175.26 h1.83
  text "Hole Size" at 30.761,175.26 h1.83
  text "Plated" at 59.201,175.26 h1.83
  text "Hole Type" at 72.05,175.26 h1.83
  text "Drill Layer Pair" at 90.689,175.26 h1.83
  text "Via/Pad" at 128.778,175.26 h1.83
  text "Pad Shape" at 143.76,175.26 h1.83
  text "Template" at 162.703,175.26 h1.83
  text "2" at 15.525,171.45 h1.52
  text "19.69mil (0.500mm)" at 30.761,171.45 h1.52
  text "PTH" at 59.201,171.45 h1.52
  text "Slot" at 72.05,171.45 h1.52
  text "Top Layer - Bottom Layer" at 90.689,171.45 h1.52
  text "Pad" at 128.778,171.45 h1.52
  text "Rounded" at 143.76,171.45 h1.52
  text "(Mixed)" at 162.703,171.45 h1.52
  text "2" at 15.525,167.64 h1.52
  text "23.62mil (0.600mm)" at 30.761,167.64 h1.52
  text "PTH" at 59.201,167.64 h1.52
  text "Rectangle" at 72.05,167.64 h1.52
  text "Top Layer - Bottom Layer" at 90.689,167.64 h1.52
  text "Pad" at 128.778,167.64 h1.52
  text "Rectangle" at 143.76,167.64 h1.52
  text "r120_220h60_140" at 162.703,167.64 h1.52
  text "5" at 15.525,163.83 h1.52
  text "19.69mil (0.500mm)" at 30.761,163.83 h1.52
  text "PTH" at 59.201,163.83 h1.52
  text "Round" at 72.05,163.83 h1.52
  text "Top Layer - Bottom Layer" at 90.689,163.83 h1.52
  text "Pad" at 128.778,163.83 h1.52
  text "Rounded" at 143.76,163.83 h1.52
  text "(Mixed)" at 162.703,163.83 h1.52
  text "8" at 15.525,160.02 h1.52
  text "35.43mil (0.900mm)" at 30.761,160.02 h1.52
  text "PTH" at 59.201,160.02 h1.52
  text "Round" at 72.05,160.02 h1.52
  text "Top Layer - Bottom Layer" at 90.689,160.02 h1.52
  text "Pad" at 128.778,160.02 h1.52
  text "(Mixed)" at 143.76,160.02 h1.52
  text "(Mixed)" at 162.703,160.02 h1.52
  text "8" at 15.525,156.21 h1.52
  text "39.37mil (1.000mm)" at 30.761,156.21 h1.52
  text "PTH" at 59.201,156.21 h1.52
  text "Round" at 72.05,156.21 h1.52
  text "Top Layer - Bottom Layer" at 90.689,156.21 h1.52
  text "Pad" at 128.778,156.21 h1.52
  text "(Mixed)" at 143.76,156.21 h1.52
  text "(Mixed)" at 162.703,156.21 h1.52
  text "8" at 15.525,152.4 h1.52
  text "118.11mil (3.000mm)" at 30.761,152.4 h1.52
  text "PTH" at 59.201,152.4 h1.52
  text "Round" at 72.05,152.4 h1.52
  text "Top Layer - Bottom Layer" at 90.689,152.4 h1.52
  text "Pad" at 128.778,152.4 h1.52
  text "Rounded" at 143.76,152.4 h1.52
  text "(Mixed)" at 162.703,152.4 h1.52
  text "519" at 15.525,148.59 h1.52
  text "11.81mil (0.300mm)" at 30.761,148.59 h1.52
  text "PTH" at 59.201,148.59 h1.52
  text "Round" at 72.05,148.59 h1.52
  text "Top Layer - Bottom Layer" at 90.689,148.59 h1.52
  text "Via" at 128.778,148.59 h1.52
  text "Rounded" at 143.76,148.59 h1.52
  text "(Mixed)" at 162.703,148.59 h1.52
  text "552 Total" at 15.525,144.78 h1.52
  text "Slot definitions :" at 2.676,141.098 h1.52
  text "Routed Path Length" at 28.907,141.098 h1.52
  text "= Calculated from tool start centre position to tool end centre position." at 56.914,141.098 h1.52
  text "Hole Length" at 28.907,138.558 h1.52
  text "= Routed Path Length + Tool Size = Slot length as defined in the PCB layout" at 46.504,138.558 h1.52

## Dimensions
110,120 to 110,0 on Dimension
0,120 to 110,120 on Dimension